# Altium PCB BLDC-Board.PcbDoc (part 6 of 7)
Units mm, origin at the board's own origin, x right, y up, seen from the top; angles counter-clockwise.
Board outline 150 x 117 mm, 4 copper layers (Top Layer, Layer 1, Layer 2, Bottom Layer), stack 1.566 mm thick; 307 components, 221 nets, 983 pads, 534 vias.
Unrouted connection lines stored in the file: 337.
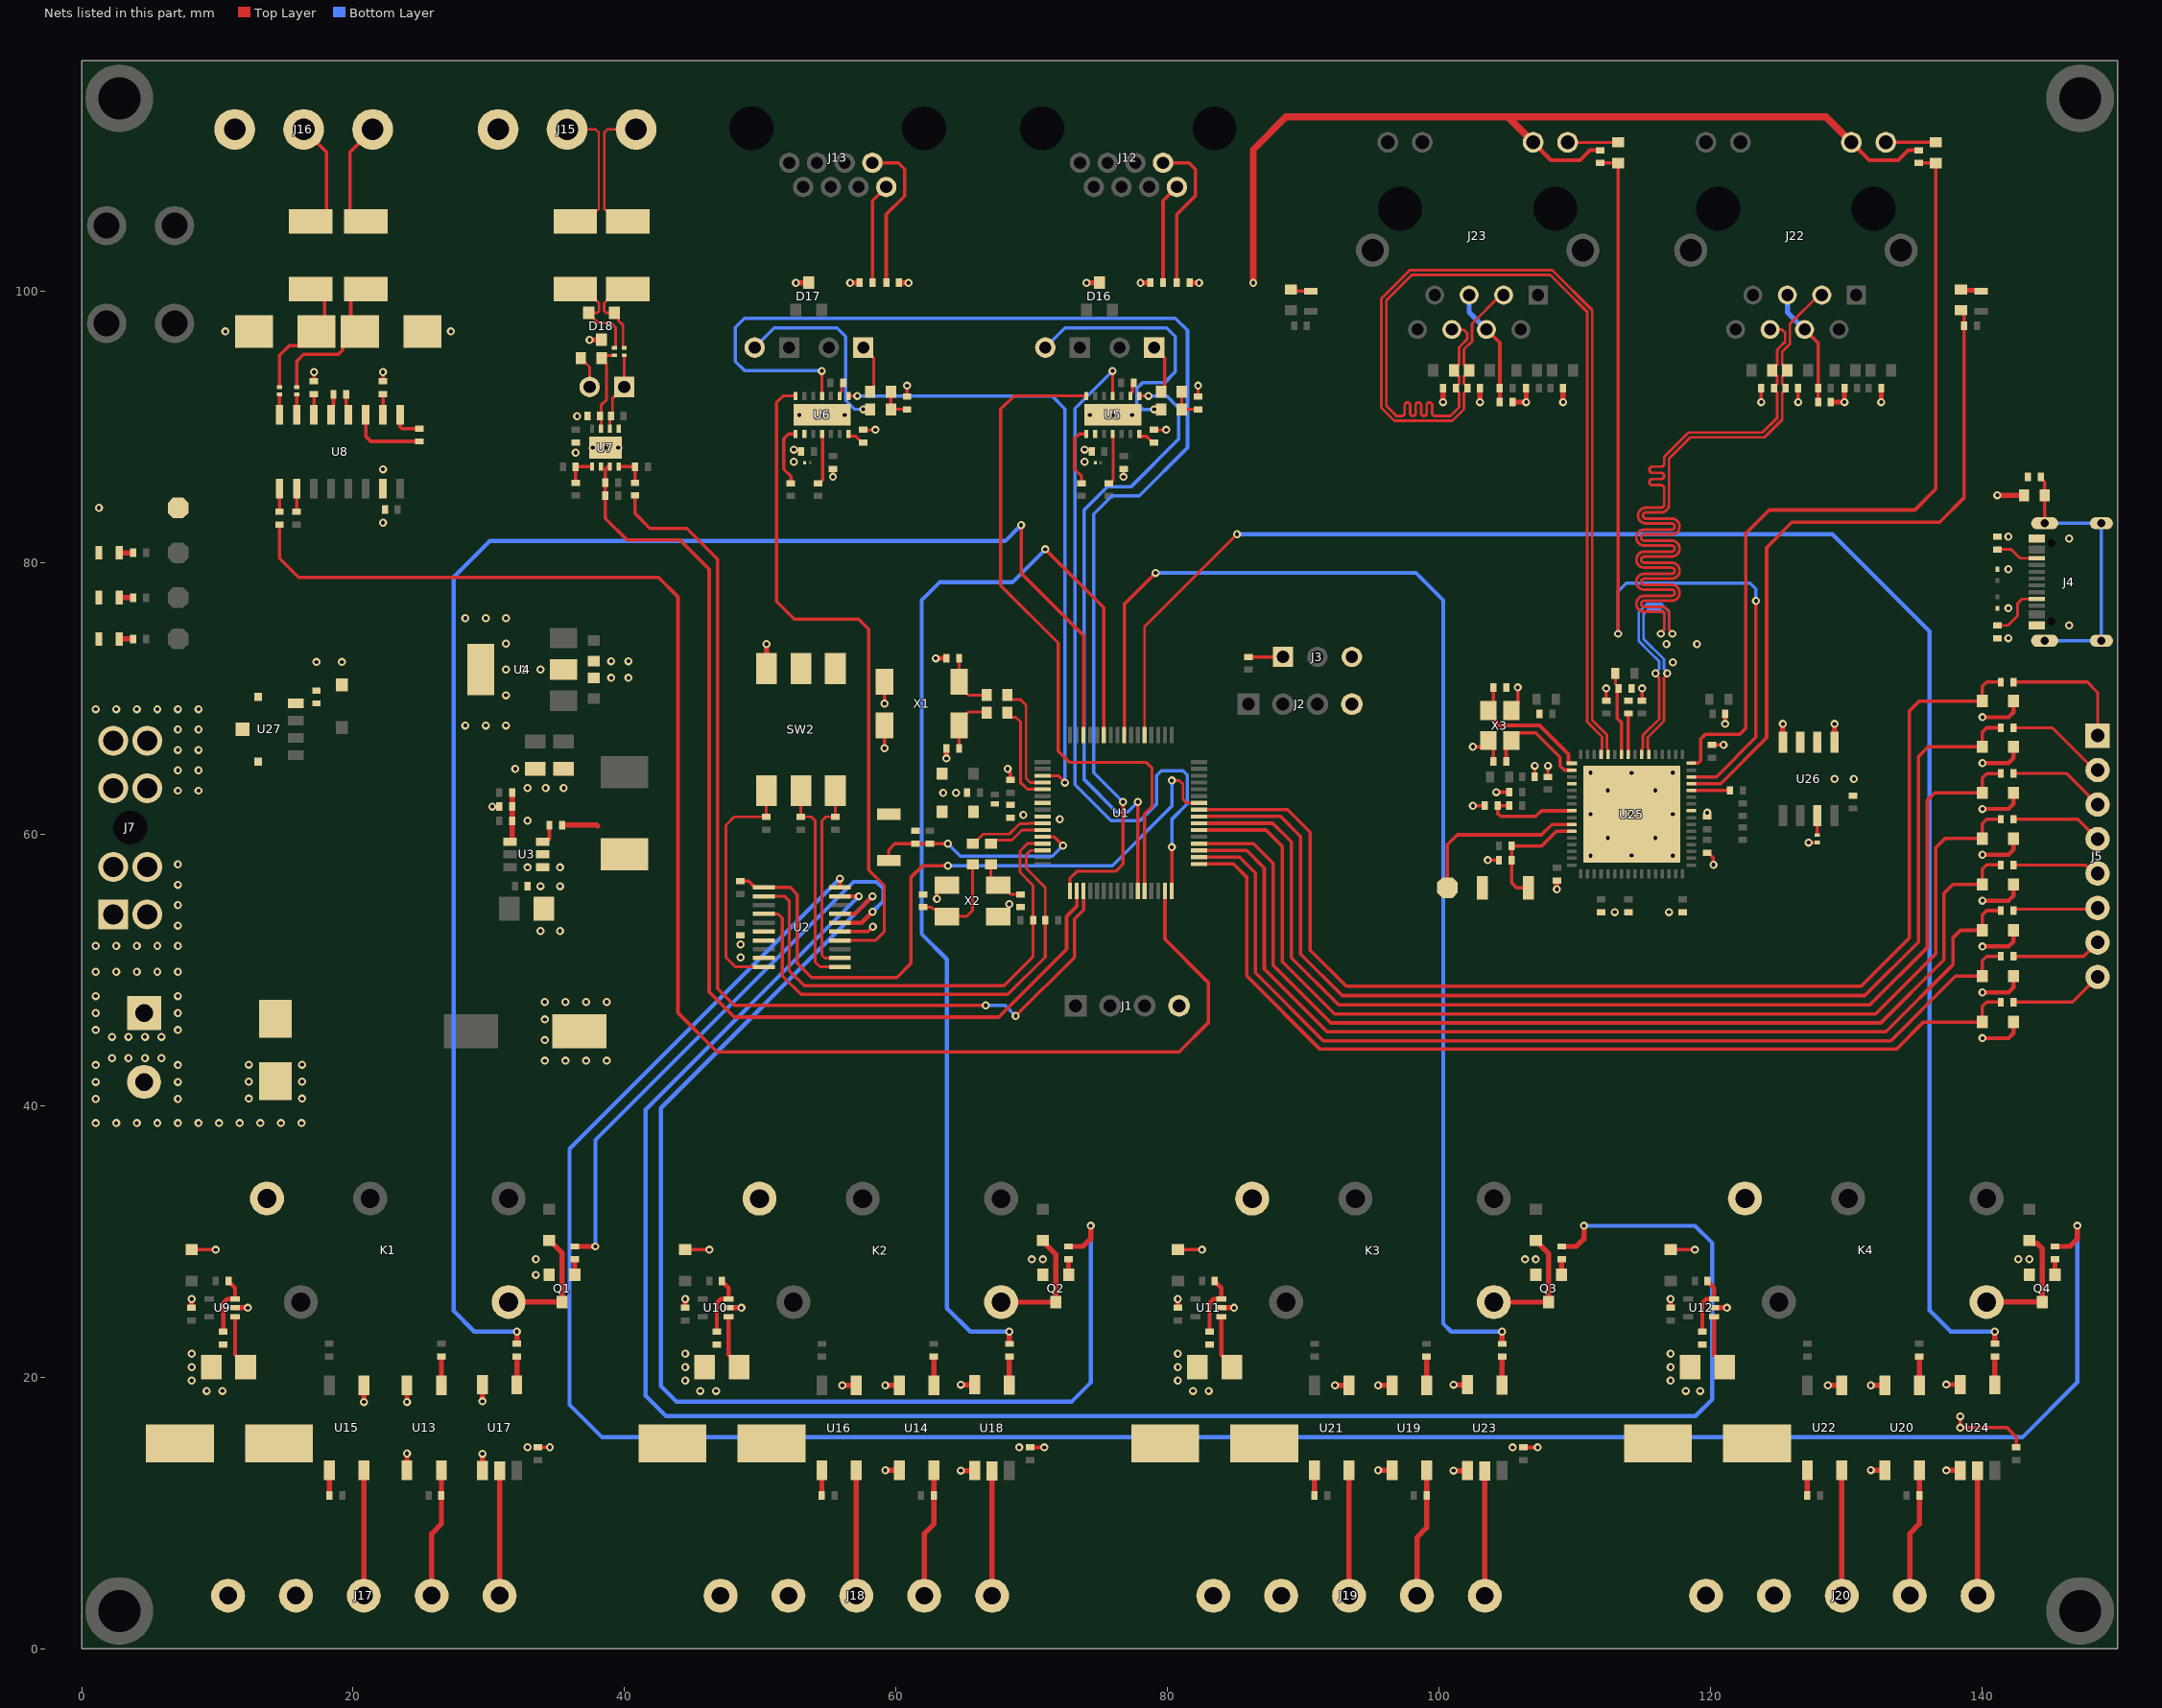
[diagram p5: the nets of this part, all layers, seen from the top]

## Via types
v1: diameter 0.6, hole 0.3, Top Layer to Bottom Layer, 534 vias

## Nets (pads, with @x,y where several pads share a name; then routed paths per layer and width w, separated by ;. In a path a pad name is that pad's centre, name@x,y a point inside that pad or via, vN(x,y) a via of type N, cw(c..) or ccw(c..) an arc to the next point about the centre after c; other vN are vias at no path point) (continued)
GND: C1.1 C2.1 C3.1 C4.2 C5.1 C6.1 C7.1 C8.1 C9.1 C10.1 C11.2 C14.1 C15.1 C18.1 C19.1 C20.1 C21.1 C22.2 C23.1 C24.2 C25.1 C26.2 C27.2 C28.1 C29.1 C30.1 C33.1 C34.1 C35.1 C36.1 C37.1 C38.1 C39.1 C42.1 C43.1 C46.1 C47.1 C48.1 C49.1 C50.1 C51.1 C52.1 C53.1 C54.1 C55.1 C56.1 C57.1 C58.1 C59.1 C60.1 C61.1 C62.1 C63.1 C64.1 C65.1 C66.1 C67.1 C68.1 C69.1 C70.1 C71.1 C72.1 C73.1 C74.1 D1.2 D2.2 D3.2 D4.2 D5.2 D6.2 D7.2 D8.2 D9.2 D10.2 D11.2 D12.2 D13.1 D14.2 D15.2 D16.3 D17.3 D18.3 D19.1 D20.1 D21.2 D22.2 D23.2 D24.2 J1.4 J2.4 J3.3 J4.A1/B12 J4.B1/A12 J6.2 J15.3 J16.3 J22.10 J23.10 LED1.2 LED2.2 LED3.2 Q1.2 Q2.2 Q3.2 Q4.2 R9.2 R10.2 R11.2 R25.1 R29.1 R30.1 R41.1 R42.1 R43.1 R44.1 R51.2 R60.1 R61.1 R62.1 R63.1 R64.2 R65.2 R66.2 R67.2 R99.1 R100.1 R107.2 R118.1 R119.1 R122.1 SW1.1 SW2.4 SW2.5 SW2.6 SW3.1 TP4.1 U1.9 U2.6 U2.7 U2.9 U2.15 U3.4 U4.2 U4.4 U5.2 U5.15 U6.2 U6.15 U7.5 U7.9 U8.15 U9.2 U10.2 U11.2 U12.2 U13.2 U13.3 U14.2 U14.3 U15.3 U16.3 U17.3 U17.4 U18.3 U18.4 U19.2 U19.3 U20.2 U20.3 U21.3 U22.3 U23.3 U23.4 U24.3 U24.4 U25.4 U25.41 U25.65 U26.1 U26.2 U26.3 U26.4 X1.2 X1.3 X2.2 X2.4 X3.2 X3.4 | length 199.3
  Top Layer w0.203: X2.2@67.538,53.947 67.788,53.947 68.337,54.495 v1(68.337,54.855)
  Top Layer w0.229: v1(55.347,86.337) C25.1@55.347,86.925 ; R30.1@57.582,89.797 v1(58.471,89.797) ; C27.2@60.808,92.246 v1(60.808,93.046) ; R29.1@79.007,89.797 v1(79.896,89.797) ; C26.2@82.245,92.246 v1(82.245,93.046) ; C55.1@107.048,64.231 v1(107.048,65.051) ; C58.1@108.014,64.231 v1(108.014,65.051)
  Top Layer w0.254: D21.2@8.106,29.395 v1(9.883,29.395) ; C30.1@17.117,93.364 v1(17.117,94.048) ; v1(20.79,18.176) U15.3@20.79,19.408 ; C29.1@22.197,93.364 v1(22.197,94.048) ; U13.3@23.964,13.158 v1(23.964,14.39) ; v1(23.964,18.176) U13.2@23.964,19.408 ; U17.4@29.52,13.133 v1(29.52,14.365) ; v1(29.52,18.226) U17.3@29.52,19.458 ; C38.1@33.625,14.835 v1(34.493,14.835) ; D22.2@44.462,29.395 v1(46.239,29.395) ; U2.15@55.855,52.831 57.929,52.831 v1(58.282,53.185) ; v1(59.143,66.338) X1.3@59.143,68.028 ; v1(59.143,69.628) X1.2@59.143,71.228 ; v1(63.013,55.246) 63.013,55.74 63.52,56.247 X2.4@63.738,56.247 ; v1(68.214,64.813) 68.214,64.719 68.428,64.506 C7.1@68.428,64.001 ; C39.1@69.875,14.827 v1(70.913,14.827) ; v1(76.75,86.337) C23.1@76.75,86.925 ; D23.2@80.759,29.395 v1(82.536,29.395) ; v1(102.489,62.106) R99.1@103.365,62.106 ; v1(102.489,66.44) 103.016,66.44 ; v1(103.587,58.096) C51.1@104.407,58.096 ; X3.2@103.619,66.907 103.999,66.527 C49.1@103.999,65.368 ; v1(104.219,63.106) C57.1@105.169,63.106 ; X3.4@105.319,69.107 105.792,69.58 v1(105.792,70.819) ; C42.1@106.223,14.827 v1(107.26,14.827) ; C53.1@112.314,69.843 v1(112.314,70.748) ; C52.1@114.952,69.843 v1(114.952,70.748) ; D24.2@117.059,29.395 v1(118.836,29.395) ; C62.1@119.748,58.639 119.837,58.639 120.193,58.283 120.193,57.766 v1(120.206,57.753) ; C60.1@120.091,66.58 v1@120.951,66.58 ; v1(121.078,68.135) C47.1@121.078,68.853 ; v1(123.736,91.84) C65.1@123.736,92.856 ; v1(126.455,91.84) C67.1@126.455,92.856 ; v1(127.229,59.387) R107.2@127.864,59.387 ; v1(138.397,17.12) v1(138.397,16.283) 141.834,16.283 142.523,15.593 C43.1@142.523,14.835
  Top Layer w0.305: J23.10@106.93,110.978 108.247,109.66 110.382,109.66 111.115,110.393 R119.1@111.862,110.393 ; J22.10@130.369,110.978 131.687,109.66 133.821,109.66 134.554,110.393 R118.1@135.301,110.393 ; v1(140.032,44.977) 141.949,44.977 142.316,45.344 D3.2@142.316,46.171 ; v1(140.032,48.355) 141.949,48.355 142.316,48.723 D4.2@142.316,49.549 ; v1(140.032,51.733) 141.949,51.733 142.316,52.101 D5.2@142.316,52.927 ; v1(140.032,55.112) 141.949,55.112 142.316,55.479 D6.2@142.316,56.305 ; v1(140.032,58.49) 141.949,58.49 142.316,58.857 D7.2@142.316,59.683 ; v1(140.032,61.868) 141.949,61.868 142.316,62.235 D8.2@142.316,63.062 ; v1(140.032,65.246) 141.949,65.246 142.316,65.614 D9.2@142.316,66.44 ; v1(140.032,68.624) 141.949,68.624 142.316,68.992 D11.2@142.316,69.818
  Top Layer w0.381: C34.1@8.106,25.116 v1(8.106,25.766) ; U9.2@11.303,25.116 v1(12.243,25.116) ; v1(20.79,18.176) U15.3@20.79,19.213 ; U13.3@23.964,13.352 v1(23.964,14.39) ; v1(23.964,18.176) U13.2@23.964,19.213 ; U17.4@29.52,13.328 v1(29.52,14.365) ; v1(29.52,18.226) U17.3@29.52,19.263 ; v1(30.251,62.043) R25.1@30.772,62.043 ; v1(37.424,96.428) D18.3@38.303,96.428 ; C35.1@44.462,25.116 v1(44.462,25.766) ; U10.2@47.659,25.116 v1(48.599,25.116) ; SW2.6@50.444,72.21 v1(50.444,74.016) ; v1(52.619,100.628) D17.3@53.569,100.628 ; v1(56.032,19.4) U16.3@57.07,19.4 ; v1(56.615,100.628) R44.1@57.312,100.628 ; v1(59.206,13.15) U14.3@60.244,13.15 ; v1(59.206,19.4) U14.2@60.244,19.4 ; R43.1@60.212,100.628 v1(60.909,100.628) ; v1(62.916,72.968) C3.1@63.703,72.968 ; v1(63.703,65.583) C4.2@63.703,66.338 ; v1(64.762,13.125) U18.4@65.8,13.125 ; v1(64.762,19.45) U18.3@65.8,19.45 ; v1(74.031,100.628) D16.3@74.981,100.628 ; v1(78.003,100.628) R42.1@78.725,100.628 ; C36.1@80.759,25.116 v1(80.759,25.766) ; R41.1@81.624,100.628 v1(82.321,100.628) ; U11.2@83.956,25.116 v1(84.895,25.116) ; v1(92.329,19.4) U21.3@93.367,19.4 ; v1(95.503,13.15) U19.3@96.54,13.15 ; v1(95.503,19.4) U19.2@96.54,19.4 ; v1(100.296,91.84) C66.1@100.296,92.856 ; v1(101.059,13.125) U23.4@102.097,13.125 ; v1(101.059,19.45) U23.3@102.097,19.45 ; v1(103.015,91.84) C68.1@103.015,92.856 ; C74.1@105.414,91.84 v1(106.418,91.84) C70.1@106.418,92.856 ; v1(108.678,55.957) C63.1@108.678,56.597 ; v1(109.136,91.84) C72.1@109.136,92.856 ; C37.1@117.059,25.116 v1(117.059,25.766) ; U12.2@120.256,25.116 v1(121.196,25.116) ; U26.4@125.324,66.778 v1(125.324,68.135) ; v1(128.629,19.408) U22.3@129.667,19.408 ; C73.1@128.854,91.84 v1(129.858,91.84) C69.1@129.858,92.856 ; U26.1@129.134,66.778 v1(129.134,68.135) ; v1(131.803,13.158) U20.3@132.841,13.158 ; v1(131.803,19.408) U20.2@132.841,19.408 ; v1(132.575,91.84) C71.1@132.575,92.856 ; v1(137.359,13.133) U24.4@138.397,13.133 ; v1(137.359,19.458) U24.3@138.397,19.458 ; v1(141.122,84.982) C9.1@143.086,84.982
  Top Layer w0.508: v1(86.309,100.628) 86.309,110.439 88.722,112.852 105.055,112.852 ; J23.10@106.93,110.978 105.055,112.852 ; J22.10@130.369,110.978 128.495,112.852 105.055,112.852
  other v1: 32.842,14.835 69.063,14.827 105.41,14.827 9.22,18.993 10.376,18.993 45.576,18.993 46.732,18.993 81.873,18.993 83.029,18.993 118.173,18.993 119.232,18.993 8.106,19.752 44.462,19.752 80.759,19.752 117.059,19.752 8.106,20.745 44.462,20.745 80.759,20.745 117.059,20.745 8.106,21.738 44.462,21.738 80.759,21.738 117.059,21.738 33.465,27.546 33.465,28.695 70.002,28.687 70.805,28.687 106.324,28.687 107.127,28.687 142.672,28.695 143.474,28.695 1.031,38.727 2.547,38.727 4.064,38.727 5.581,38.727 7.098,38.727 8.614,38.727 10.131,38.727 11.648,38.727 13.164,38.727 14.681,38.727 16.198,38.727 1.031,40.505 7.098,40.505 12.319,40.528 16.231,40.528 1.031,41.755 7.098,41.755 12.319,41.778 16.231,41.778 1.031,43.005 7.098,43.005 12.319,43.028 16.231,43.028 34.126,43.321 35.643,43.321 37.16,43.321 38.676,43.321 2.244,43.516 3.457,43.516 4.671,43.516 5.884,43.516 34.126,44.838 34.126,46.354 34.126,47.636 35.643,47.636 37.16,47.636 38.676,47.636 48.539,50.925 48.539,51.891 33.797,52.876 35.244,52.876 112.935,54.264 116.935,54.264 33.797,56.178 35.244,56.178 32.855,57.565 35.244,57.565 111.149,58.427 114.185,58.445 117.221,58.427 112.435,59.731 115.935,59.731 32.855,60.998 72.06,61.106 69.376,61.422 111.149,61.481 114.185,61.481 117.221,61.481 119.75,61.594 63.475,63.062 64.414,63.062 112.435,63.231 115.935,63.231 32.855,63.405 34.182,63.405 35.509,63.405 129.134,64.078 130.556,64.078 114.185,64.517 111.149,64.535 117.221,64.535 31.941,64.814 120.951,66.581 28.27,68.015 29.769,68.015 31.267,68.015 31.267,70.243 39.014,71.52 40.284,71.52 31.267,72.143 32.537,72.143 33.807,72.143 117.221,72.663 17.297,72.688 19.177,72.688 39.014,72.754 40.284,72.754 116.749,74.009 118.999,74.009 31.267,74.043 141.935,74.447 146.415,75.387 28.27,75.914 29.769,75.914 31.267,75.914 141.935,76.647 141.935,79.523 146.415,81.787 141.935,81.926 22.197,82.95 1.27,84.042 22.197,86.887 52.468,87.446 73.883,87.446 36.395,88.106 52.468,88.338 73.883,88.338 37.653,88.484 38.588,88.484 39.522,88.484 36.504,90.801 52.871,90.897 54.544,90.897 56.218,90.897 74.283,90.897 75.958,90.897 77.39,90.897 10.592,97.047 27.203,97.047
I2C3_SCL: R6.1 U1.13 U2.2 | length 36.6
  Top Layer w0.203: R6.1@70.093,53.667 70.093,56.235 69.124,57.204 69.124,58.77 69.667,59.313 U1.13@70.806,59.313
  Top Layer w0.229: U2.2@50.255,55.431 51.797,55.431 52.125,55.103 52.125,49.952 53.236,48.841 67.937,48.841 70.093,50.997 R6.1@70.093,53.667
I2C3_SDA: R7.1 U1.14 U2.4 | length 36.3
  Top Layer w0.203: U1.14@70.806,58.813 69.91,58.813 69.586,58.489 69.586,57.476 70.988,56.074 70.988,53.985
  Top Layer w0.229: U2.4@50.255,54.131 51.307,54.131 51.621,53.818 51.621,49.569 52.984,48.206 68.244,48.206 70.988,50.95 R7.1@70.988,53.667 70.988,53.985
ID0: R22.1 SW2.1 U2.10 | length 18
  Top Layer w0.203: U2.10@50.255,50.231 48.158,50.231 47.464,50.925 47.464,60.677 48.071,61.284 R22.1@50.444,61.284 SW2.1@50.444,63.21
ID1: R21.1 SW2.2 U2.11 | length 15.5
  Top Layer w0.203: SW2.2@52.984,63.21 R21.1@52.984,61.284 53.746,61.284 54.051,60.979 54.051,50.565 54.385,50.231 U2.11@55.855,50.231
ID2: R12.1 SW2.3 U2.12 | length 14.3
  Top Layer w0.203: SW2.3@55.524,63.21 R12.1@55.524,61.284 54.839,61.284 54.534,60.979 54.534,51.084 54.737,50.881 U2.12@55.855,50.881
INH_MASK: U1.32 U5.11 | length 54.7
  Top Layer w0.203: U5.11@75.945,92.31 v1(75.945,94.131)
  Top Layer w0.254: U1.32@80.306,55.813 v1(80.306,59.051)
  Bottom Layer w0.254: v1(75.945,94.131) 73.177,91.363 73.177,63.646 75.82,61.003 77.97,61.003 79.186,62.219 79.186,64.328 79.547,64.689 81.128,64.689 81.444,64.373 81.444,62.235 80.306,61.097 v1(80.306,59.051)
INH_MASK_2: U1.17 U6.11 | length 94.6
  Top Layer w0.203: U6.11@54.531,92.31 v1(54.531,94.131)
  Top Layer w0.229: U1.17@72.806,55.813 72.806,56.77 73.306,57.27 76.174,57.27 76.708,57.804 v1(76.708,62.377)
  Bottom Layer w0.254: v1@54.513,94.202 v1@54.462,94.151 ; v1(54.531,94.131) 54.511,94.151 v1@54.462,94.151 ; v1(76.708,62.377) 74.551,64.534 74.551,83.584 75.902,84.934 77.911,84.934 81.464,88.487 81.464,97.122 80.574,98.012 48.836,98.012 48.158,97.334 48.158,94.834 48.841,94.151 v1@54.462,94.151
INT_EXP: R8.1 U1.42 U2.1 | length 51.9
  Top Layer w0.203: v1(80.306,63.963) 80.865,63.963 81.128,63.7 81.128,62.567 81.382,62.313 U1.42@82.306,62.313
  Top Layer w0.254: R8.1@48.539,56.551 49.145,56.551 49.582,56.114 49.615,56.081 U2.1@50.255,56.081 52.208,56.081 52.721,55.569 52.721,50.51 53.783,49.448 60.056,49.448 61.079,50.472 61.079,56.812 61.957,57.69 v1(63.816,57.69)
  Bottom Layer w0.254: v1(63.816,57.69) 75.934,57.69 80.306,62.062 v1(80.306,63.963)
LEDPOL0: R114.1 R118.2 U25.48 | length 61
  Top Layer w0.254: U25.48@118.585,65.231 118.59,65.236 119.08,65.236 119.278,65.433 119.278,67.013 119.643,67.379 122.16,67.379 122.593,67.811 122.593,82.155 124.328,83.89 135.045,83.89 136.576,85.421 R114.1@136.576,109.454 R118.2@135.331,109.454
LEDPOL1: R115.1 R119.2 U25.46 | length 66.6
  Top Layer w0.254: R119.2@111.862,109.454 R115.1@113.182,109.454 v1(113.182,74.771) ; U25.46@118.585,64.231 120.43,64.231 123.342,67.143 v1(123.342,77.184)
  Bottom Layer w0.254: v1(113.182,74.771) 113.182,77.895 113.787,78.5 122.912,78.5 123.342,78.07 v1(123.342,77.184)
M1_PWR: R72.2 U2.16 | length 43.4
  Top Layer w0.305: U2.16@55.855,53.481 57.453,53.481 58.263,54.291 v1(58.268,54.291)
  Top Layer w0.381: R72.2@36.332,29.635 v1(37.846,29.635)
  Bottom Layer w0.305: v1(37.846,29.635) 37.846,37.48 56.868,56.502 58.55,56.502 59.055,55.997 59.055,55.079 v1(58.268,54.291)
M2_PWR: R73.2 U2.17 | length 92.6
  Top Layer w0.305: U2.17@55.855,54.131 56.968,54.131 v1(58.268,55.431)
  Top Layer w0.381: R73.2@72.695,29.635 73.777,29.635 74.336,30.194 v1(74.336,31.159)
  Bottom Layer w0.305: v1(58.268,55.431) 42.672,39.836 42.672,19.34 43.8,18.212 72.947,18.212 74.336,19.601 v1(74.336,31.159)
M3_PWR: R74.2 U2.19 | length 148.7
  Top Layer w0.305: U2.19@55.855,55.431 v1(57.252,55.431)
  Top Layer w0.381: R74.2@109.027,29.635 110.109,29.635 110.668,30.194 v1(110.668,31.159)
  Bottom Layer w0.305: v1(57.252,55.431) 41.553,39.733 41.553,18.631 43.045,17.14 118.885,17.14 120.125,18.38 120.125,29.881 118.847,31.159 v1(110.668,31.159)
M4_PWR: R75.2 U2.20 | length 175.8
  Top Layer w0.305: U2.20@55.855,56.081 v1(55.855,56.737)
  Top Layer w0.381: R75.2@145.374,29.635 146.456,29.635 147.015,30.194 v1(147.015,31.159)
  Bottom Layer w0.305: v1(55.855,56.737) 35.941,36.823 35.941,17.977 38.341,15.576 142.964,15.576 147.015,19.628 v1(147.015,31.159)
MOTOR1_DIR: J17.4 R80.1 U13.4 | length 9.5
  Top Layer w0.381: J17.4@25.79,3.913 25.79,8.478 26.504,9.192 R80.1@26.504,11.304 U13.4@26.504,13.158
MOTOR1_FG: J17.3 U15.2 | length 9.2
  Top Layer w0.381: J17.3@20.79,3.913 U15.2@20.79,13.158
MOTOR1_GND: C40.2 J17.2 R60.2 U9.1 | length 4
  Top Layer w0.305: U9.1@11.303,24.466 11.303,21.653 12.084,20.872 R60.2@12.084,20.745
MOTOR1_PLUS: C40.1 J17.1 K1.4
MOTOR1_SPEED: J17.5 U17.5 | length 9.2
  Top Layer w0.381: J17.5@30.79,3.913 U17.5@30.79,13.108
MOTOR2_DIR: J18.4 R81.1 U14.4 | length 9.5
  Top Layer w0.381: J18.4@62.07,3.905 62.07,8.47 62.784,9.184 R81.1@62.784,11.296 U14.4@62.784,13.15
MOTOR2_FG: J18.3 U16.2 | length 9.2
  Top Layer w0.381: J18.3@57.07,3.905 U16.2@57.07,13.15
MOTOR2_GND: C41.2 J18.2 R61.2 U10.1 | length 4
  Top Layer w0.305: U10.1@47.659,24.466 47.659,21.653 48.44,20.872 R61.2@48.44,20.745
MOTOR2_PLUS: C41.1 J18.1 K2.4
MOTOR2_SPEED: J18.5 U18.5 | length 9.2
  Top Layer w0.381: J18.5@67.07,3.905 U18.5@67.07,13.1
MOTOR3_DIR: J19.4 R90.1 U19.4 | length 9.5
  Top Layer w0.381: J19.4@98.367,3.905 98.367,8.194 99.08,8.908 R90.1@99.08,11.296 U19.4@99.08,13.15
MOTOR3_FG: J19.3 U21.2 | length 9.2
  Top Layer w0.381: J19.3@93.367,3.905 U21.2@93.367,13.15
MOTOR3_GND: C44.2 J19.2 R62.2 U11.1 | length 4
  Top Layer w0.305: U11.1@83.956,24.466 83.956,21.653 84.737,20.872 R62.2@84.737,20.745
MOTOR3_PLUS: C44.1 J19.1 K3.4
MOTOR3_SPEED: J19.5 U23.5 | length 9.2
  Top Layer w0.381: J19.5@103.367,3.905 U23.5@103.367,13.1
MOTOR4_DIR: J20.4 R91.1 U20.4 | length 9.5
  Top Layer w0.381: J20.4@134.667,3.913 134.667,8.478 135.381,9.192 R91.1@135.381,11.304 U20.4@135.381,13.158
MOTOR4_FG: J20.3 U22.2 | length 9.2
  Top Layer w0.381: J20.3@129.667,3.913 U22.2@129.667,13.158
MOTOR4_GND: C45.2 J20.2 R63.2 U12.1 | length 4
  Top Layer w0.305: U12.1@120.256,24.466 120.256,21.653 121.037,20.872 R63.2@121.037,20.745
MOTOR4_PLUS: C45.1 J20.1 K4.4
MOTOR4_SPEED: J20.5 U24.5 | length 9.2
  Top Layer w0.381: J20.5@139.667,3.913 U24.5@139.667,13.108
NetC1_2: C1.2 R4.1 X2.1 | length 7.5
  Top Layer w0.203: C1.2@61.981,54.627 62.603,54.627 62.735,54.495 62.94,54.495 63.488,53.947 65.194,53.947 65.638,54.391 R4.1@65.638,57.789
NetC2_2: C2.2 R5.1 X2.3 | length 3.7
  Top Layer w0.203: R5.1@66.985,57.789 66.985,56.795 67.533,56.247 X2.3@67.538,56.247 67.788,56.247 68.469,55.567 C2.2@69.169,55.567
NetC3_2: C3.2 R2.1 X1.1 | length 4.4
  Top Layer w0.203: C3.2@64.643,72.968 X1.1@64.643,71.228 64.643,70.928 65.321,70.25 R2.1@66.675,70.25
NetC4_1: C4.1 R3.1 X1.4 | length 4.3
  Top Layer w0.203: C4.1@64.643,66.338 X1.4@64.643,68.028 64.643,68.328 65.321,69.006 66.624,69.006 R3.1@66.675,68.954
NetC8_2: C8.2 D1.1 L1.2 U1.7
NetC9_2: C9.2 J4.S1 J4.S2 J4.S3 J4.S4 R9.1 | length 20.5
  Top Layer w0.229: R9.1@144.318,86.328 144.318,86.239 144.61,85.947 C9.2@144.61,84.982 J4.S1@144.61,82.912
  Bottom Layer w0.254: J4.S4@144.61,74.262 J4.S3@148.79,74.262 J4.S2@148.79,82.912 J4.S1@144.61,82.912
NetC16_1: C16.1 L2.1 U3.5 | length 2.6
  Top Layer w0.381: C16.1@35.397,60.681 37.941,60.681 37.998,60.623
NetC16_2: C16.2 U3.6 | length 1.5
  Top Layer w0.254: U3.6@34.076,59.465 34.274,59.465 34.457,59.648 C16.2@34.457,60.681
NetC17_1: C17.1 R24.1 R25.2 U3.1 | length 3.8
  Top Layer w0.381: U3.1@31.456,59.465 31.591,59.465 31.71,59.585 31.712,59.585 R25.2@31.712,62.043 R24.1@31.712,63.087
NetC26_1: C26.1 R37.2 R38.1 | length 2.5
  Top Layer w0.229: R38.1@81.039,92.602 R37.2@81.039,91.306 C26.1@82.245,91.306
NetC27_1: C27.1 R39.2 R40.1 | length 2.5
  Top Layer w0.229: R40.1@59.614,92.602 R39.2@59.614,91.306 C27.1@60.808,91.306
NetC29_2: C29.2 U8.2 | length 1.8
  Top Layer w0.254: U8.2@22.197,90.647 C29.2@22.197,92.424
NetC30_2: C30.2 U8.6 | length 1.8
  Top Layer w0.254: U8.6@17.117,90.647 C30.2@17.117,92.424
NetC31_1: C31.1 U8.1 | length 2.1
  Top Layer w0.254: U8.1@23.467,90.647 23.467,90.022 23.605,89.884 C31.1@24.867,89.884
NetC31_2: C31.2 U8.3 | length 5.4
  Top Layer w0.254: U8.3@20.927,90.635 20.927,89.329 21.311,88.944 C31.2@24.867,88.944
NetC32_1: C32.1 U8.4 | length 1.8
  Top Layer w0.254: C32.1@19.492,92.399 19.492,91.537 19.657,91.372 U8.4@19.657,90.647
NetC32_2: C32.2 U8.5 | length 1.8
  Top Layer w0.254: U8.5@18.387,90.647 18.387,91.372 18.552,91.537 C32.2@18.552,92.399
NetC46_2: C46.2 U25.1 X3.1 | length 10.2
  Top Layer w0.254: C46.2@103.999,70.819 103.999,69.487 X3.1@103.619,69.107 104.092,68.634 104.092,68.317 104.391,68.018 107.408,68.018 109.532,65.895 109.532,65.231 U25.1@109.785,65.231
NetC49_2: C49.2 U25.2 X3.3 | length 8
  Top Layer w0.254: C49.2@104.939,65.368 104.939,66.527 X3.3@105.319,66.907 105.319,66.999 105.792,67.472 107.12,67.472 108.918,65.674 108.918,65.035 109.223,64.731 U25.2@109.785,64.731
NetC50_2: C50.2 FB3.2 U25.58 | length 6.2
  Top Layer w0.203: FB3.2@112.994,71.85 112.994,71.067 113.224,70.837 C50.2@113.224,70.748
  Top Layer w0.254: C50.2@113.224,70.748 113.128,70.653 113.128,68.538 113.435,68.231 U25.58@113.435,65.881
NetC73_2: C73.2 J22.4 J22.5 R112.1 | length 8.8
  Top Layer w0.254: J22.4@126.924,97.188 127.914,96.198 R112.1@127.914,92.856 C73.2@127.914,91.84
  Bottom Layer w0.381: J22.5@125.654,99.728 125.654,98.458 J22.4@126.924,97.188
NetC74_2: C74.2 J23.4 J23.5 R113.1 | length 8.8
  Top Layer w0.254: J23.4@103.485,97.188 104.475,96.198 R113.1@104.475,92.856 C74.2@104.475,91.84
  Bottom Layer w0.381: J23.5@102.215,99.728 102.215,98.458 J23.4@103.485,97.188
NetD13_2: D13.2 J6.1 J7.1 J7.2 J7.7 J7.8
  other v1: 2.244,45.073 3.457,45.073 4.671,45.073 5.884,45.073 1.031,45.585 7.098,45.585 1.031,46.835 7.098,46.835 1.031,48.085 7.098,48.085 1.031,49.863 2.547,49.863 4.064,49.863 5.581,49.863 7.098,49.863 1.031,51.779 2.547,51.779 4.064,51.779 5.581,51.779 7.098,51.779 7.098,53.279 7.098,54.779 7.098,56.28 7.098,57.78
NetD18_1: D18.1 F2.1 R55.2 | length 6.5
  Top Layer w0.203: R55.2@39.964,95.833 39.92,95.833 39.887,95.866 39.887,97.511 39.559,97.839 39.559,98.122 D18.1@39.253,98.428 38.624,98.428 38.489,98.563 38.489,99.135 39.524,100.169 F2.1@40.234,100.169
NetD18_2: D18.2 F1.1 R54.2 | length 7.6
  Top Layer w0.203: F1.1@36.373,100.169 37.083,100.169 38.117,99.135 38.117,98.563 37.982,98.428 D18.2@37.353,98.428 37.353,98.378 38.07,97.661 39.001,97.661 39.325,97.337 39.325,95.866 39.292,95.833 R54.2@39.253,95.833
NetD19_2: D19.2 F4.2 R57.1 | length 8.9
  Top Layer w0.254: R57.1@14.577,92.949 14.577,95.285 15.298,96.006 16.257,96.006 D19.2@17.297,97.047 ; F4.2@16.866,100.169 17.14,100.169 17.903,99.406 D19.2@17.903,97.653
NetD20_2: D20.2 F3.2 R56.1 | length 11.7
  Top Layer w0.254: R56.1@15.847,92.949 15.847,94.852 16.35,95.355 18.908,95.355 19.233,95.68 19.233,95.974 20.306,97.047 D20.2@20.498,97.047 19.827,97.718 19.827,99.406 20.59,100.169 F3.2@20.93,100.169
NetD25_2: D25.2 K1.2 Q1.3 | length 8.9
  Top Layer w0.381: K1.2@31.455,25.546 Q1.3@35.382,25.546 35.382,29.167 34.482,30.067 D25.2@34.432,30.067
NetD26_2: D26.2 K2.2 Q2.3 | length 8.9
  Top Layer w0.381: K2.2@67.735,25.538 Q2.3@71.662,25.538 ; D26.2@70.762,30.059 71.755,29.066 Q2.3@71.755,25.538
NetD27_2: D27.2 K3.2 Q3.3 | length 8.9
  Top Layer w0.381: K3.2@104.032,25.538 Q3.3@107.959,25.538 ; D27.2@107.127,30.067 107.177,30.067 107.387,29.858 107.387,29.808 108.077,29.117 Q3.3@108.077,25.538
NetD28_2: D28.2 K4.2 Q4.3 | length 9.2
  Top Layer w0.381: K4.2@140.332,25.546 Q4.3@144.424,25.546 144.424,29.483 144.05,29.858 143.684,29.858 D28.2@143.474,30.067
NetD29_1: D29.1 R122.2 U27.4
NetJ3_1: J3.1 R1.1 | length 2.5
  Top Layer w0.254: R1.1@85.954,73.069 J3.1@88.494,73.069
NetJ4_A5: J4.A5 R10.1 | length 4.3
  Top Layer w0.203: R10.1@141.122,75.387 141.902,75.387 142.626,76.111 142.626,77.02 142.943,77.337 J4.A5@144.04,77.337
NetJ4_B5: J4.B5 R11.1 | length 3.2
  Top Layer w0.203: R11.1@141.122,80.987 142.139,80.987 142.789,80.337 J4.B5@144.04,80.337
NetJ5_1: J5.1 R13.2 | length 9.7
  Top Layer w0.229: R13.2@142.316,71.213 147.754,71.213 148.509,70.457 J5.1@148.509,67.272
NetJ5_2: J5.2 R14.2 | length 7.5
  Top Layer w0.229: R14.2@142.316,67.845 145.166,67.845 148.279,64.732 J5.2@148.509,64.732
NetJ5_3: J5.3 R15.2 | length 7.1
  Top Layer w0.229: R15.2@142.316,64.478 146.223,64.478 J5.3@148.509,62.192
NetJ5_4: J5.4 R16.2 | length 6.8
  Top Layer w0.229: R16.2@142.316,61.111 147.051,61.111 J5.4@148.509,59.652
NetJ5_5: J5.5 R17.2 | length 6.5
  Top Layer w0.229: R17.2@142.316,57.743 147.59,57.743 148.221,57.112 J5.5@148.509,57.112
NetJ5_6: J5.6 R18.2 | length 6.3
  Top Layer w0.229: R18.2@142.316,54.376 142.414,54.474 148.412,54.474 J5.6@148.509,54.572
NetJ5_7: J5.7 R19.2 | length 6.6
  Top Layer w0.229: R19.2@142.316,51.009 147.486,51.009 J5.7@148.509,52.032
NetJ5_8: J5.8 R20.2 | length 7
  Top Layer w0.229: R20.2@142.316,47.641 146.659,47.641 J5.8@148.509,49.492
NetJ7_3: J7.3 J7.4 J7.5 J7.6 U27.5_6 U27.7 U27.8
  other v1: 7.098,63.213 8.614,63.213 7.098,64.713 8.614,64.713 7.098,66.213 8.614,66.213 7.098,67.713 8.614,67.713 1.031,69.213 2.547,69.213 4.064,69.213 5.581,69.213 7.098,69.213 8.614,69.213
NetJ8_2: J8.2 R37.1 | length 19.5
  Top Layer w0.229: v1(79.007,91.306) R37.1@79.515,91.306
  Bottom Layer w0.254: J8.2@70.993,95.853 72.447,97.307 79.938,97.307 80.574,96.67 80.574,94.067 79.769,93.262 78.149,93.262 77.739,92.852 77.739,91.709 78.142,91.306 v1(79.007,91.306)
NetJ9_1: J9.1 R38.2 | length 3.7
  Top Layer w0.229: J9.1@79.008,95.853 79.783,95.078 79.783,92.869 R38.2@79.515,92.602
NetJ10_2: J10.2 R39.1 | length 14.4
  Top Layer w0.229: v1(57.582,91.306) R39.1@58.09,91.306
  Bottom Layer w0.229: J10.2@49.567,95.853 51.021,97.307 55.639,97.307 56.276,96.67 56.276,91.975 56.945,91.306 v1(57.582,91.306)
NetJ11_1: J11.1 R40.2 | length 3.7
  Top Layer w0.229: J11.1@57.582,95.853 58.357,95.078 58.357,92.869 R40.2@58.09,92.602
NetJ12_7: J12.7 R41.2 | length 11.5
  Top Layer w0.254: J12.7@79.664,109.467 81.578,109.467 82.036,109.01 82.036,107.023 80.684,105.671 R41.2@80.684,100.628
NetJ12_8: J12.8 R42.2 | length 7.5
  Top Layer w0.254: R42.2@79.664,100.628 79.664,106.667 J12.8@80.684,107.687
NetJ13_7: J13.7 R43.2 | length 11.5
  Top Layer w0.254: J13.7@58.252,109.467 60.166,109.467 60.624,109.01 60.624,107.023 59.272,105.671 R43.2@59.272,100.628
NetJ13_8: J13.8 R44.2 | length 7.5
  Top Layer w0.254: R44.2@58.252,100.628 58.252,106.667 J13.8@59.272,107.687
NetJ14_1: J14.1 R52.2 R55.1 U7.6 | length 5.8
  Top Layer w0.203: U7.6@38.913,89.884 R52.2@38.913,90.801 ; R52.2@38.99,90.801 39.109,90.92 39.109,92.102 J14.1@39.964,92.957 R55.1@39.964,95.283
NetJ14_2: J14.2 R53.2 | length 2.4
  Top Layer w0.203: R53.2@36.779,95.072 37.424,94.426 J14.2@37.424,92.957
NetJ22_9: J22.9 R114.2 | length 3.7
  Top Layer w0.254: J22.9@132.909,110.978 R114.2@136.576,110.978
NetJ23_9: J23.9 R115.2 | length 3.7
  Top Layer w0.203: J23.9@109.47,110.978 R115.2@113.182,110.978
NetLED1_1: LED1.1 R26.2 | length 1
  Top Layer w0.381: LED1.1@2.77,74.39 R26.2@3.81,74.39
NetLED2_1: LED2.1 R27.2 | length 1
  Top Layer w0.381: LED2.1@2.77,77.438 R27.2@3.81,77.438
NetLED3_1: LED3.1 R28.2 | length 1
  Top Layer w0.381: LED3.1@2.77,80.74 R28.2@3.81,80.74
NetLED4_2: LED4.2 R117.1 | length 1.5
  Top Layer w0.381: R117.1@138.443,100.134 138.5,100.077 139.867,100.077 LED4.2@139.924,100.02
NetLED5_2: LED5.2 R121.1 | length 1.5
  Top Layer w0.254: R121.1@89.078,100.134 89.191,100.02 LED5.2@90.559,100.02
NetQ1_1: Q1.1 R72.1 | length 1.1
  Top Layer w0.381: Q1.1@36.332,27.546 R72.1@36.332,28.695
NetQ2_1: Q2.1 R73.1 | length 1.1
  Top Layer w0.381: Q2.1@72.705,27.538 R73.1@72.705,28.685
NetQ3_1: Q3.1 R74.1 | length 1.2
  Top Layer w0.381: Q3.1@109.027,27.538 R74.1@109.027,28.695
NetQ4_1: Q4.1 R75.1 | length 1.1
  Top Layer w0.381: Q4.1@145.374,27.546 R75.1@145.374,28.695
NetR29_2: R29.2 U5.7 | length 1.4
  Top Layer w0.229: U5.7@77.908,89.497 77.908,89.356 77.944,89.321 78.455,89.321 78.919,88.857 R29.2@79.007,88.857
NetR30_2: R30.2 U6.7 | length 1.4
  Top Layer w0.229: U6.7@56.494,89.497 56.494,89.364 56.53,89.328 57.022,89.328 57.478,88.872 R30.2@57.567,88.872
NetR31_2: R31.2 U5.9 | length 1
  Top Layer w0.254: U5.9@77.258,92.297 77.258,92.447 77.406,92.595 R31.2@77.406,93.262
NetR32_2: R32.2 U6.9 | length 1.1
  Top Layer w0.229: U6.9@55.844,92.297 55.844,92.447 55.982,92.584 55.982,93.148 R32.2@56.096,93.262
NetR33_1: R33.1 U5.4 | length 3.8
  Top Layer w0.229: R33.1@75.679,85.858 75.768,85.858 75.994,86.084 75.994,89.462 U5.4@75.958,89.497
NetR34_1: R34.1 U5.1 | length 4.5
  Top Layer w0.229: R34.1@73.661,85.858 73.661,86.379 73.144,86.896 73.144,89.149 73.492,89.497 U5.1@74.008,89.497
NetR35_1: R35.1 U6.4 | length 3.8
  Top Layer w0.229: R35.1@54.265,85.858 54.354,85.858 54.58,86.084 54.58,89.462 U6.4@54.544,89.497
NetR36_1: R36.1 U6.1 | length 4.5
  Top Layer w0.229: R36.1@52.246,85.858 52.246,86.379 51.73,86.896 51.73,89.149 52.078,89.497 U6.1@52.594,89.497
NetR45_2: R45.2 R47.1 U7.1 | length 2.4
  Top Layer w0.254: R45.2@36.395,85.896 R47.1@36.395,87.084 U7.1@37.612,87.084
NetR46_2: R46.2 R50.1 U7.4 | length 2.4
  Top Layer w0.254: U7.4@39.563,87.084 R50.1@40.767,87.084 R46.2@40.767,85.896
NetR51_1: R51.1 R53.1 R54.1 U7.7 | length 6.6
  Top Layer w0.203: U7.7@38.263,89.884 38.263,90.801 38.263,91.615 38.676,92.028 38.676,94.636 38.303,95.008 R53.1@38.303,95.072 38.514,95.283 R54.1@39.253,95.283
NetR56_2: R56.2 U8.7 | length 1.8
  Top Layer w0.229: U8.7@15.847,90.647 R56.2@15.847,92.399
NetR57_2: R57.2 U8.8 | length 1.8
  Top Layer w0.229: U8.8@14.577,90.647 R57.2@14.577,92.399
NetR58_1: R58.1 U8.10 | length 2
  Top Layer w0.254: R58.1@15.847,83.763 U8.10@15.847,85.717
NetR59_1: R59.1 U8.9 | length 2
  Top Layer w0.254: R59.1@14.577,83.763 U8.9@14.577,85.717
NetR64_1: R64.1 R68.1 U9.3 | length 4.7
  Top Layer w0.305: R64.1@10.439,23.349 10.439,25.479 10.718,25.758 11.296,25.758 U9.3@11.303,25.766 11.303,26.578 10.95,26.93 10.899,26.93 10.823,27.006 R68.1@10.823,27.095
NetR65_1: R65.1 R69.1 U10.3 | length 4.7
  Top Layer w0.305: R65.1@46.795,23.349 46.795,25.479 47.074,25.758 47.652,25.758 U10.3@47.659,25.766 47.659,26.578 47.306,26.93 47.255,26.93 47.179,27.006 R69.1@47.179,27.095
NetR66_1: R66.1 R70.1 U11.3 | length 4.7
  Top Layer w0.305: R66.1@83.092,23.349 83.092,25.479 83.371,25.758 83.948,25.758 U11.3@83.956,25.766 83.956,26.578 83.603,26.93 83.552,26.93 83.476,27.006 R70.1@83.476,27.095
NetR67_1: R67.1 R71.1 U12.3 | length 4.7
  Top Layer w0.305: R67.1@119.392,23.349 119.392,25.479 119.671,25.758 120.249,25.758 U12.3@120.256,25.766 120.256,26.578 119.903,26.93 119.852,26.93 119.776,27.006 R71.1@119.776,27.095
NetR76_2: R76.2 U13.1 | length 2.1
  Top Layer w0.381: U13.1@26.504,19.408 R76.2@26.504,21.528
NetR77_2: R77.2 U14.1 | length 2.1
  Top Layer w0.381: U14.1@62.784,19.4 R77.2@62.784,21.52
NetR82_1: R82.1 U15.1 | length 1.9
  Top Layer w0.381: R82.1@18.25,11.304 U15.1@18.25,13.158
NetR83_1: R83.1 U16.1 | length 1.9
  Top Layer w0.381: R83.1@54.53,11.296 U16.1@54.53,13.15
NetR84_2: R84.2 U17.1 | length 2.1
  Top Layer w0.381: U17.1@32.06,19.433 R84.2@32.06,21.528
NetR85_2: R85.2 U18.1 | length 2.1
  Top Layer w0.381: U18.1@68.34,19.425 R85.2@68.34,21.52
NetR86_2: R86.2 U19.1 | length 2.1
  Top Layer w0.381: U19.1@99.08,19.4 R86.2@99.08,21.52
NetR87_2: R87.2 U20.1 | length 2.1
  Top Layer w0.381: U20.1@135.381,19.408 R87.2@135.381,21.528
NetR92_1: R92.1 U21.1 | length 1.9
  Top Layer w0.381: R92.1@90.827,11.296 U21.1@90.827,13.15
NetR93_1: R93.1 U22.1 | length 1.9
  Top Layer w0.381: R93.1@127.127,11.304 U22.1@127.127,13.158
NetR94_2: R94.2 U23.1 | length 2.1
  Top Layer w0.381: U23.1@104.637,19.425 R94.2@104.637,21.52
NetR95_2: R95.2 U24.1 | length 2.1
  Top Layer w0.381: U24.1@140.937,19.433 R95.2@140.937,21.528
NetR98_2: R98.2 R99.2 U25.8 | length 7.2
  Top Layer w0.254: R98.2@105.169,62.106 R99.2@104.305,62.106 104.305,61.548 104.54,61.312 107.116,61.312 107.535,61.731 U25.8@109.785,61.731
NetR100_2: R100.2 U25.57 | length 3
  Top Layer w0.254: U25.57@113.935,65.881 R100.2@113.935,68.904
NetR101_2: R101.2 U25.44 | length 2.8
  Top Layer w0.254: U25.44@118.585,63.231 R101.2@121.425,63.231
NetR107_1: R107.1 U26.7 | length 1.4
  Top Layer w0.254: R107.1@127.864,59.937 U26.7@127.864,61.378
NetTP5_1: TP5.1 U25.10 | length 13
  Top Layer w0.254: TP5.1@100.609,56.064 100.609,59.233 101.339,59.963 107.534,59.963 108.302,60.731 U25.10@109.785,60.731
nFAULT_CAN: U1.27 U5.8 | length 46.4
  Top Layer w0.229: U1.27@77.806,55.813 v1(77.806,62.377) ; U5.8@77.908,92.297 v1(78.58,92.297)
  Bottom Layer w0.254: v1(77.806,62.377) 77.073,61.645 76.239,61.645 73.864,64.02 73.864,83.914 75.54,85.591 77.292,85.591 80.823,89.121 80.823,91.412 79.938,92.297 v1(78.58,92.297)
nFAULT_CAN_2: U1.3 U6.8 | length 45.7
  Top Layer w0.229: U6.8@56.494,92.297 v1(57.141,92.297) v1@57.166,92.297 ; U1.3@70.806,64.313 71.941,64.313 v1(72.441,63.813)
  Bottom Layer w0.254: v1(57.141,92.297) 71.479,92.297 72.441,91.335 v1(72.441,63.813)
NRST: C10.2 R23.1 SW1.2 U1.12 | length 16.3
  Top Layer w0.229: SW1.2@59.454,58.083 59.454,58.863 59.904,59.313 R23.1@62.502,59.313 ; R23.1@62.512,59.302 v1(63.816,59.302) ; U1.12@70.806,59.813 71.646,59.813 v1(72.297,59.162)
  Bottom Layer w0.254: v1(63.816,59.302) 64.73,58.388 71.524,58.388 v1(72.297,59.162)
nSTB_CAN: U1.28 U5.14 | length 50.4
  Top Layer w0.229: U5.14@74.008,92.297 68.675,92.297 67.702,91.324 67.702,78.338 71.94,74.1 71.94,66.129 72.763,65.307 78.401,65.307 78.854,64.853 78.854,62.063 78.306,61.515 U1.28@78.306,55.813
nSTB_CAN_2: U2.14 U6.14 | length 50.2
  Top Layer w0.229: U6.14@52.594,92.297 51.671,92.297 51.187,91.813 51.187,77.164 52.506,75.844 57.235,75.844 57.974,75.106 57.974,57.374 59.131,56.216 59.131,52.841 58.471,52.181 U2.14@55.855,52.181
PA8: D6.1 R17.1 U1.36 | length 77.3
  Top Layer w0.254: U1.36@82.306,59.313 86.328,59.313 87.786,57.855 87.786,50.347 92.024,46.108 132.538,46.108 137.185,50.756 137.185,55.645 137.846,56.305 D6.1@140.016,56.305 ; D6.1@140.016,56.316 140.016,57.426 140.334,57.743 R17.1@141.377,57.743
PB13: D3.1 R20.1 U1.33 | length 71.1
  Top Layer w0.254: U1.33@82.306,57.813 84.849,57.813 85.843,56.819 85.843,49.542 91.219,44.166 133.679,44.166 135.684,46.171 D3.1@140.016,46.171 ; D3.1@140.016,46.214 140.016,47.324 140.334,47.641 R20.1@141.377,47.641
PB14: D4.1 R19.1 U1.34 | length 72.2
  Top Layer w0.254: U1.34@82.306,58.313 85.302,58.313 86.459,57.156 86.459,49.797 91.474,44.781 133.277,44.781 138.045,49.549 D4.1@140.016,49.549 ; D4.1@140.016,49.581 140.016,50.691 140.334,51.009 R19.1@141.377,51.009
PB15: D5.1 R18.1 U1.35 | length 74.5
  Top Layer w0.254: U1.35@82.306,58.813 85.825,58.813 87.122,57.516 87.122,50.072 91.749,45.445 132.903,45.445 137.846,50.388 137.846,52.368 138.405,52.927 D5.1@140.016,52.927 ; D5.1@140.016,52.949 140.016,54.059 140.334,54.376 R18.1@141.377,54.376
PC6: D7.1 R16.1 U1.38 | length 80.8
  Top Layer w0.254: U1.38@82.306,60.313 87.244,60.313 88.44,59.117 88.44,50.617 92.295,46.762 132.154,46.762 136.601,51.21 136.601,59.023 137.262,59.683 D7.1@140.016,59.683 140.016,60.793 140.334,61.111 R16.1@141.377,61.111
PC7: D8.1 R15.1 U1.39 | length 83.7
  Top Layer w0.254: U1.39@82.306,60.813 87.748,60.813 89.122,59.438 89.122,50.9 92.578,47.445 131.754,47.445 135.966,51.657 135.966,62.503 136.525,63.062 D8.1@140.016,63.062 140.016,64.161 140.334,64.478 R15.1@141.377,64.478
PC14-OSC32_IN: R2.2 U1.4 | length 8.4
  Top Layer w0.203: R2.2@68.199,70.25 68.199,70.212 68.478,69.933 69.146,69.933 69.571,69.508 69.571,64.124 69.882,63.813 U1.4@70.806,63.813
PC15-OSC32_OUT: R3.2 U1.5 | length 7.6
  Top Layer w0.203: R3.2@68.199,68.954 68.199,68.907 68.478,68.628 68.82,68.628 69.155,68.293 69.155,63.836 69.678,63.313 U1.5@70.806,63.313
PD8: D9.1 R14.1 U1.40 | length 86.4
  Top Layer w0.254: U1.40@82.306,61.313 88.32,61.313 89.798,59.835 89.798,51.18 92.858,48.121 131.363,48.121 135.306,52.063 135.306,65.729 136.017,66.44 D9.1@140.016,66.44 140.016,67.528 140.334,67.845 R14.1@141.377,67.845
PD9: D11.1 R13.1 U1.41 | length 89.2
  Top Layer w0.254: U1.41@82.306,61.813 88.843,61.813 90.5,60.156 90.5,51.471 93.148,48.823 131.1,48.823 134.645,52.368 134.645,69.081 135.382,69.818 D11.1@140.016,69.818 140.016,70.895 140.334,71.213 R13.1@141.377,71.213
PF0-OSC_IN: R4.2 U1.10 | length 5.8
  Top Layer w0.203: R4.2@65.638,59.313 65.702,59.313 66.403,60.014 68.339,60.014 69.091,60.767 69.676,60.767 69.722,60.813 U1.10@70.806,60.813
PF1-OSC_OUT: R5.2 U1.11 | length 4.2
  Top Layer w0.203: R5.2@66.985,59.313 67.252,59.58 68.541,59.58 69.273,60.313 U1.11@70.806,60.313
PWM1_IN: R84.1 U1.62 | length 121
  Top Layer w0.254: v1(69.207,82.782) 69.207,79.231 73.806,74.633 U1.62@73.806,67.313
  Top Layer w0.381: R84.1@32.06,22.468 v1(32.06,23.363)
  Bottom Layer w0.305: v1(32.06,23.363) 28.929,23.363 27.416,24.876 27.416,78.966 30.052,81.602 68.027,81.602 v1(69.207,82.782)
PWM2_IN: R85.1 U1.59 | length 85.3
  Top Layer w0.254: v1(70.995,80.998) 75.306,76.688 U1.59@75.306,67.313
  Top Layer w0.381: R85.1@68.34,22.46 v1(68.34,23.355)
  Bottom Layer w0.305: v1(68.34,23.355) 65.468,23.355 63.747,25.076 63.747,50.795 61.887,52.655 61.887,77.254 63.195,78.562 68.559,78.562 v1(70.995,80.998)
PWM3_IN: R94.1 U1.56 | length 93.7
  Top Layer w0.254: U1.56@76.806,67.313 76.806,76.939 v1(79.121,79.254)
  Top Layer w0.381: R94.1@104.637,22.46 v1(104.637,23.355)
  Bottom Layer w0.305: v1(79.121,79.254) 98.285,79.254 100.299,77.24 100.299,23.951 100.896,23.355 v1(104.637,23.355)
PWM4_IN: R95.1 U1.53 | length 128
  Top Layer w0.203: U1.53@78.306,67.313 78.306,75.29 v1(85.115,82.1)
  Top Layer w0.381: R95.1@140.937,22.468 v1(140.937,23.363)
  Bottom Layer w0.305: v1(85.115,82.1) 128.98,82.1 136.126,74.953 136.126,24.928 137.691,23.363 v1(140.937,23.363)
RE/DE/RS485/T: R48.1 R49.1 U1.18 U7.2 U7.3 | length 78.1
  Top Layer w0.254: U7.3@38.913,87.084 38.768,87.084 38.583,86.898 R48.1@38.583,85.896 R49.1@38.583,84.955 38.583,83.283 40.197,81.668 44.085,81.668 46.23,79.523 46.23,48.381 48.081,46.53 67.55,46.53 72.56,51.539 72.56,53.947 73.306,54.693 U1.18@73.306,55.813
RS232_RX: F3.1 J16.1 | length 8.2
  Top Layer w0.254: F3.1@20.93,105.149 20.524,105.149 19.761,105.912 19.761,110.255 J16.1@21.438,111.931
RS232_TX: F4.1 J16.2 | length 8.2
  Top Layer w0.254: J16.2@16.358,111.931 18.034,110.255 18.034,105.912 17.271,105.149 F4.1@16.866,105.149
RS485_N: F1.2 J15.2 | length 10.2
  Top Layer w0.165: J15.2@35.763,111.931 37.861,111.931 38.094,111.699 38.094,106.054 37.997,105.957 37.18,105.957 F1.2@36.373,105.149
RS485_P: F2.2 J15.1 | length 10.2
  Top Layer w0.165: F2.2@40.234,105.149 39.426,105.957 38.609,105.957 38.513,106.054 38.513,111.713 38.731,111.931 J15.1@40.843,111.931
RST#: C51.2 R102.2 SW3.2 U25.11 | length 9
  Top Layer w0.254: SW3.2@106.577,56.064 105.716,56.064 105.347,56.433 C51.2@105.347,58.096 R102.2@105.347,59.137 107.552,59.137 108.645,60.231 U25.11@109.785,60.231
RUNLED: R116.1 R117.2 U25.45 | length 50.9
  Top Layer w0.254: U25.45@118.585,63.731 120.75,63.731 124.13,67.111 124.13,81.126 125.993,82.989 136.864,82.989 138.684,84.809 R116.1@138.684,97.459 138.684,98.368 R117.2@138.443,98.61
RXA_N: C65.2 J22.6 R103.1 U25.54 | length 72.7
  Top Layer w0.203: U25.54@115.435,65.881 115.412,65.904 115.412,66.31 115.363,66.359 115.363,67.146 116.351,68.135 116.559,68.343 116.559,71.528 116.808,71.777 v1(116.808,71.85) ; v1(116.333,74.771) 116.333,74.844 116.582,75.093 116.582,75.889 116.582,76.168 ccw(c116.354,76.168) 116.354,76.397 115.111,76.397 cw(c115.111,76.981) 115.111,77.565 117.135,77.565 ccw(c117.135,77.794) 117.135,78.022 115.111,78.022 cw(c115.111,78.606) 115.111,79.191 117.135,79.191 ccw(c117.135,79.419) 117.135,79.648 115.111,79.648 cw(c115.111,80.232) 115.111,80.816 117.135,80.816 ccw(c117.135,81.045) 117.135,81.273 115.111,81.273 cw(c115.111,81.858) 115.111,82.442 117.135,82.442 ccw(c117.135,82.67) 117.135,82.899 115.239,82.899 cw(c115.239,83.483) 115.239,84.067 116.354,84.067 ccw(c116.354,84.296) 116.582,84.296 116.582,85.03 116.582,85.386 116.582,85.487 ccw(c116.354,85.487) 116.354,85.716 115.714,85.716 cw(c115.714,85.944) 115.714,86.173 116.354,86.173 ccw(c116.354,86.402) 116.354,86.63 115.714,86.63 cw(c115.714,86.859) 115.714,87.087 116.354,87.087 ccw(c116.354,87.316) 116.582,87.316 116.582,87.819 116.597,87.834 118.361,89.598 118.571,89.598 119.03,89.598 123.732,89.598 123.819,89.598 124.918,90.697 124.918,92.525 124.676,92.767 C65.2@124.676,92.856 124.676,92.945 124.918,93.186 124.918,93.732 124.536,94.113 R103.1@124.536,94.177 124.536,94.24 124.918,94.621 124.918,95.701 125.126,95.909 125.489,96.273 125.489,96.964 125.269,97.184 124.388,97.184 J22.6@124.384,97.188
  Bottom Layer w0.203: v1(116.333,74.771) 116.333,74.844 116.582,75.093 116.582,76.273 116.51,76.346 116.251,76.604 115.453,76.604 115.062,76.213 115.062,74.385 116.559,72.888 116.559,72.172 116.808,71.923 v1(116.808,71.85)
RXA_P: C67.2 J22.3 R105.1 U25.55 | length 72.9
  Top Layer w0.203: U25.55@114.935,65.881 114.958,65.904 114.958,66.31 115.007,66.359 115.007,67.294 116.204,68.49 116.204,71.528 115.954,71.777 v1(115.954,71.85) ; v1(117.187,74.771) 117.187,74.844 116.938,75.093 116.938,75.889 116.938,76.168 ccw(c116.354,76.168) 116.354,76.752 115.111,76.752 cw(c115.111,76.981) 115.111,77.209 117.135,77.209 ccw(c117.135,77.794) 117.135,78.378 115.111,78.378 cw(c115.111,78.606) 115.111,78.835 117.135,78.835 ccw(c117.135,79.419) 117.135,80.003 115.111,80.003 cw(c115.111,80.232) 115.111,80.461 117.135,80.461 ccw(c117.135,81.045) 117.135,81.629 115.111,81.629 cw(c115.111,81.858) 115.111,82.086 117.135,82.086 ccw(c117.135,82.67) 117.135,83.255 115.239,83.255 cw(c115.239,83.483) 115.239,83.712 116.354,83.712 ccw(c116.354,84.296) 116.938,84.296 116.938,85.03 116.938,87.672 118.508,89.242 123.966,89.242 125.273,90.55 125.273,92.525 125.515,92.767 C67.2@125.515,92.856 125.515,92.945 125.273,93.186 125.273,93.732 125.654,94.113 R105.1@125.654,94.177 125.654,94.24 125.273,94.621 125.273,95.554 125.845,96.125 125.845,97.599 127.973,99.728 J22.3@128.194,99.728
  Bottom Layer w0.203: v1(115.954,71.85) 115.954,71.923 116.204,72.172 116.204,72.74 115.545,73.399 114.706,74.238 114.706,76.36 115.306,76.96 116.399,76.96 116.503,76.856 116.938,76.421 116.938,75.093 117.187,74.844 v1(117.187,74.771)
RXB_N: C66.2 J23.6 R104.1 U25.61 | length 75.9
  Top Layer w0.203: J23.6@100.945,97.188 100.97,97.162 101.829,97.162 102.061,96.931 102.061,96.46 101.686,96.085 101.478,95.877 101.478,94.621 101.096,94.24 R104.1@101.096,94.177 101.096,94.113 101.478,93.732 101.478,93.186 101.236,92.945 C66.2@101.236,92.856 101.236,92.767 101.478,92.525 101.478,91.464 100.838,90.824 100.205,90.824 99.697,90.824 cw(c99.697,91.027) 99.494,91.027 99.494,91.615 ccw(c99.291,91.615) 99.088,91.615 99.088,91.027 cw(c98.884,91.027) 98.681,91.027 98.681,91.615 ccw(c98.478,91.615) 98.275,91.615 98.275,91.027 cw(c98.072,91.027) 97.868,91.027 97.868,91.615 ccw(c97.665,91.615) 97.462,91.615 97.462,91.027 cw(c97.259,91.027) 97.259,90.824 96.85,90.824 96.801,90.873 96.7,90.975 96.114,91.56 96.114,99.333 97.993,101.212 108.179,101.212 109.144,100.247 110.921,98.47 110.921,68.267 112.007,67.182 112.007,66.359 111.958,66.31 111.958,65.904 U25.61@111.935,65.881
RXB_P: C68.2 J23.3 R106.1 U25.60 | length 76
  Top Layer w0.203: J23.3@104.755,99.728 104.533,99.728 102.416,97.611 102.416,96.312 101.833,95.73 101.833,94.621 102.215,94.24 R106.1@102.215,94.177 102.215,94.113 101.833,93.732 101.833,93.186 102.075,92.945 C68.2@102.075,92.856 102.075,92.767 101.833,92.525 101.833,91.316 100.985,90.468 96.703,90.468 95.966,91.205 95.758,91.413 95.758,99.48 97.846,101.568 108.326,101.568 111.277,98.617 111.277,68.415 112.363,67.329 112.363,66.359 112.412,66.31 112.412,65.904 U25.60@112.435,65.881
RXD/RS232: R59.2 U1.31 | length 115.8
  Top Layer w0.254: R59.2@14.577,82.823 14.577,80.337 15.989,78.925 42.503,78.925 43.931,77.496 43.931,46.844 46.812,43.963 80.848,43.963 82.99,46.106 82.99,49.079 79.806,52.263 U1.31@79.806,55.813
RXD/RS485: R46.1 U1.19 | length 74.5
  Top Layer w0.254: R46.1@40.767,84.956 40.767,83.645 41.874,82.538 44.577,82.538 46.845,80.27 46.845,48.636 48.091,47.39 v1(66.599,47.39) ; v1(68.807,46.613) 73.135,50.941 73.135,53.755 73.806,54.426 U1.19@73.806,55.813
  Bottom Layer w0.254: v1(66.599,47.39) 68.029,47.39 v1(68.807,46.613)